# Altium PCB MainBoardPCB_4.PcbDoc (part 10 of 32)
Units mm, origin at the board's own origin, x right, y up, seen from the top; angles counter-clockwise.
Board outline 333.63 x 349.38 mm, 16 copper layers (L1, L2 (GND), L3 (Sign), L4 (GND), L5 (Sign), L6 (PWR/GND), L7(PWR/GND), L8 (Plane_GND), L9 (PWR/GND), L10 (PWR/GND), L11 (PWR/GND), L12 (Sign), L13 (GND), L14 (Sign), L15 (GND), L16), stack 2.502 mm thick; 2205 components, 1648 nets, 8314 pads, 3172 vias.
Unrouted connection lines stored in the file: 5141.
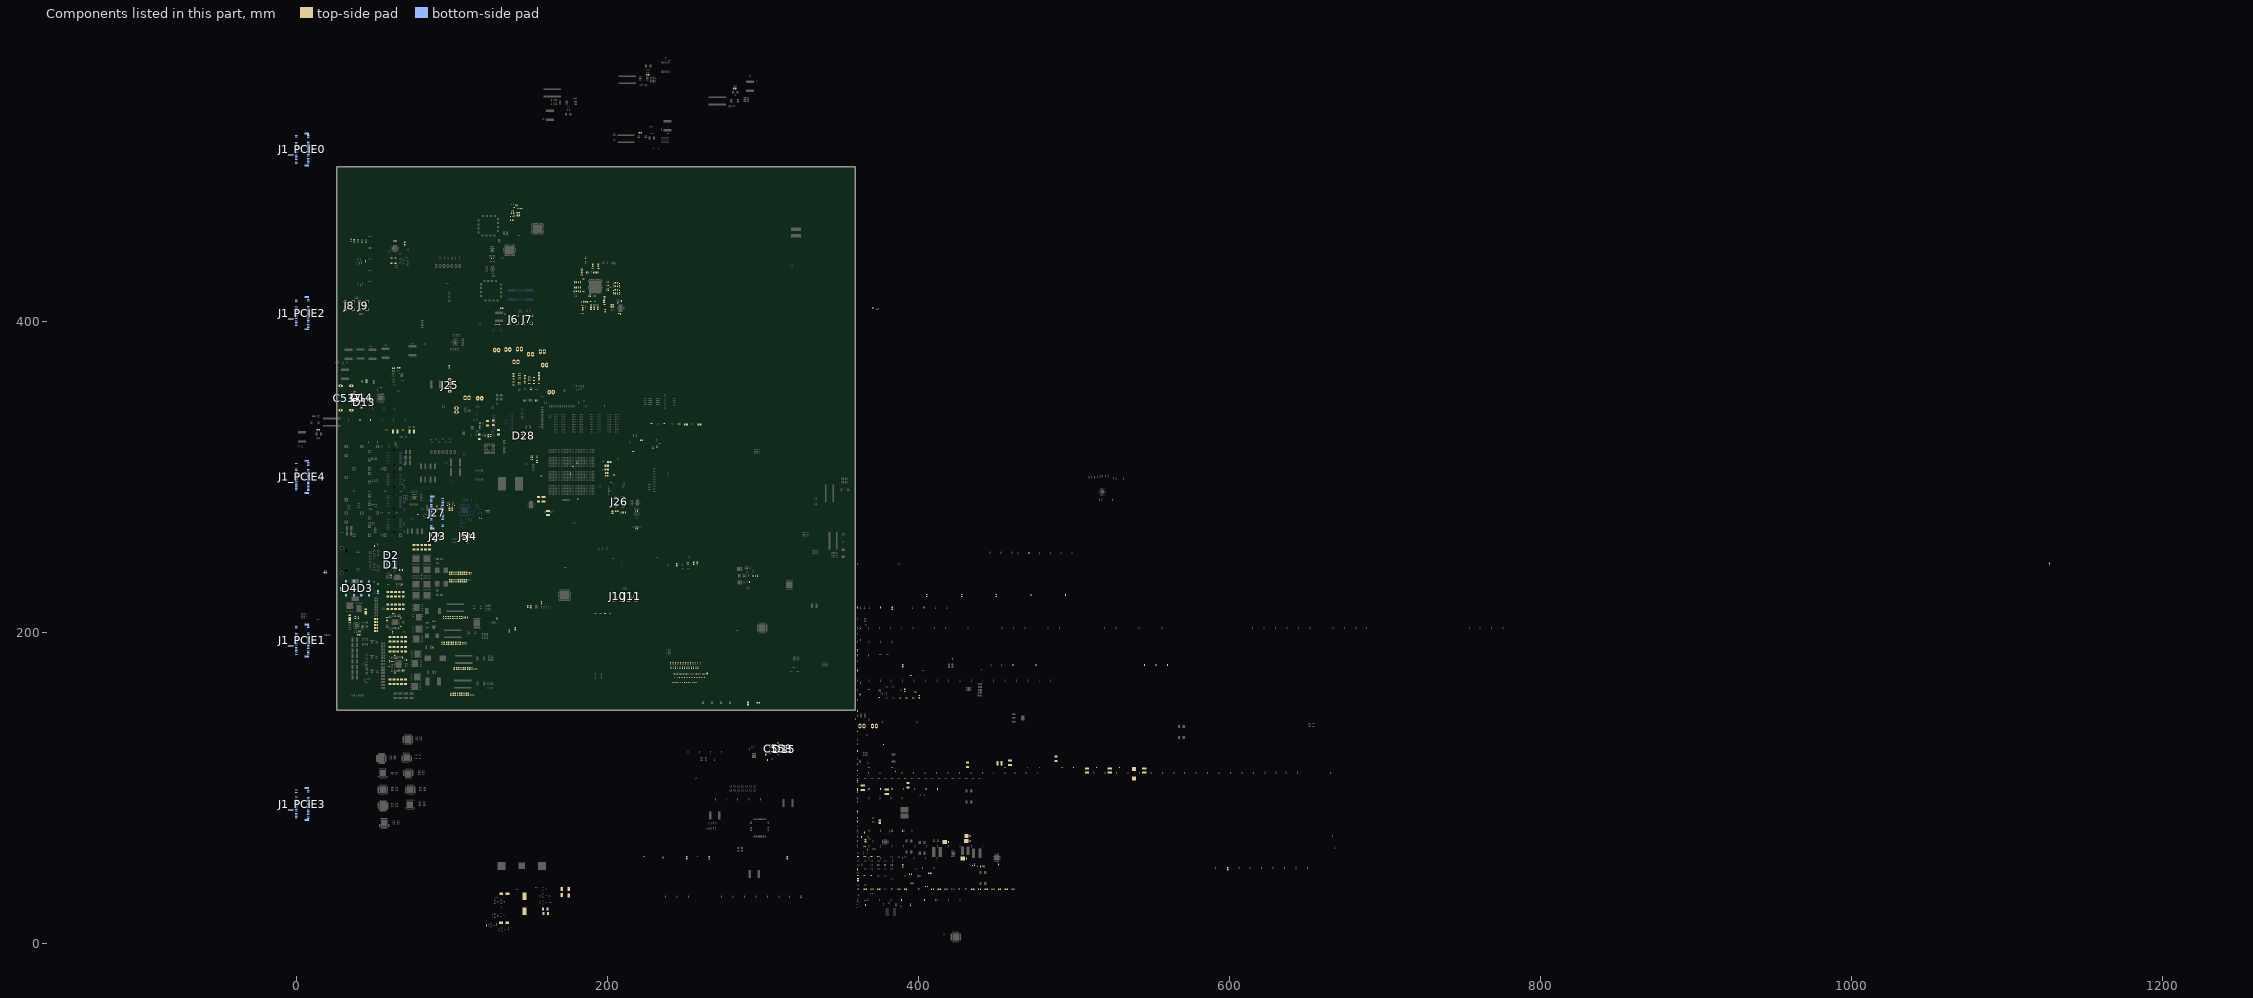
[diagram p19: the components of this part, seen from the top]

## Part data (continued)
C605 C616: library part Capacitor, Case/Package=0201, Case Code (Metric)=0603, Dielectric=C0G, Manufacturer=Murata, Manufacturer Part Number=GRM0335C1E101JA01D, Max Operating Temperature=125°C, Min Operating Temperature=-55°C, Package Quantity=15000, Supplier Part Number 1=490-3160-1-ND, Tolerance=5%, Voltage=25V, Capacitance=100pF, Case Code (Imperial)=0201, ComponentLink1Description=https://datasheet.ciiva.com/16497/grm0335c1e101ja01-01-16497112.pdf?src-supplier=Future+Electronics, ComponentLink1URL=https://datasheet.ciiva.com/16497/grm0335c1e101ja01-01-16497112.pdf?src-supplier=Future+Electronics, ComponentLink2Description=https://datasheet.ciiva.com/18697/product-18697797.pdf?src-supplier=Digi-Key, ComponentLink2URL=https://datasheet.ciiva.com/18697/product-18697797.pdf?src-supplier=Digi-Key, Depth=0.3mm, Height=0.3mm, Lead Free="Lead Free", Length=0.6mm, Mount="Surface Mount", Packaging="Tape and Reel", Pricing 1="1 = 0,10000, 10 = 0,01300, 100 = 0,00560, 500 = 0,00400, 1000 = 0,00315, 2500 = 0,00286, 5000 = 0,00263 (USD)", Radiation Hardening=No, REACH SVHC="No SVHC", RoHS=Yes, Stock 1=1884783, Supplier 1=Digi-Key, Termination=SMD/SMT, Thickness=0.013inch, Voltage Rating=25V, Voltage Rating (DC)=25V, Width=0.012inch
C609: "Supercapacitors / Ultracapacitors 0.22F 5.5volts SMD Super Capacitor", Capacitance=220mF, Case/Package=Radial, ESR (Equivalent Series Resistance)=25R, Leakage Current=330uA, Manufacturer=KEMET, Max Operating Temperature=70°C, Min Operating Temperature=-25°C, Package Quantity=500, Supplier Part Number 1=18X4838, Tolerance=80%, Voltage=5.5V, Category=Capacitors, ComponentLink1Description=https://datasheet.ciiva.com/29533/docfinderpartnumber-fc0h224zftbr24-29533957.pdf?src-supplier=Digi-Key, ComponentLink1URL=https://datasheet.ciiva.com/29533/docfinderpartnumber-fc0h224zftbr24-29533957.pdf?src-supplier=Digi-Key, ComponentLink2Description=https://datasheet.ciiva.com/46644/70368307-46644566.pdf?src-supplier=Allied+Electronics, ComponentLink2URL=https://datasheet.ciiva.com/46644/70368307-46644566.pdf?src-supplier=Allied+Electronics, ComponentLink3Description=https://datasheet.ciiva.com/28448/1754672-28448906.pdf?src-supplier=Element14, ComponentLink3URL=https://datasheet.ciiva.com/28448/1754672-28448906.pdf?src-supplier=Element14, ComponentLink4Description=https://datasheet.ciiva.com/29984/kem-s6011-fc-29984986.pdf?src-supplier=Avnet, ComponentLink4URL=https://datasheet.ciiva.com/29984/kem-s6011-fc-29984986.pdf?src-supplier=Avnet, Depth=8.5mm, Diameter=10.5mm, Height=8.5mm, Height - Seated (Max)=0.335inch, Lead Pitch=5mm, Length=10.8mm, Manufacturer Part Number=FC0H224ZFTBR24, Mount="Surface Mount", Packaging="Tape and Reel", Radiation Hardening=No, REACH SVHC="No SVHC", RoHS=Yes, Supplier 1=Newark, Termination=SMD/SMT, Voltage Rating=5.5V, Voltage Rating (DC)=5.5V, Width=10.8mm
C624 C625 C626: library part Capacitor, Case/Package=0201, Case Code (Metric)=0603, Dielectric=X5R, Manufacturer=Yageo, Manufacturer Part Number=CC0201KRX5R7BB103, Max Operating Temperature=85°C, Min Operating Temperature=-55°C, Supplier Part Number 1=311-1596-1-ND, Tolerance=10%, Voltage Rating=16V, Capacitance=10nF, Case Code (Imperial)=0201, ComponentLink1Description=http://components.arrow.com/part/dataview/0323_04166367?src-supplier=Arrow+Europe, ComponentLink1URL=http://components.arrow.com/part/dataview/0323_04166367?src-supplier=Arrow+Europe, ComponentLink2Description=http://www.mouser.com/ds/2/447/UPY-GPHC_X5R_4V-to-50V_25-1131599.pdf?src-supplier=Mouser, ComponentLink2URL=http://www.mouser.com/ds/2/447/UPY-GPHC_X5R_4V-to-50V_25-1131599.pdf?src-supplier=Mouser, ComponentLink3Description=http://www.yageo.com/documents/recent/UPY-GPHC_X5R_4V-to-50V_25.pdf?src-supplier=Digi-Key, ComponentLink3URL=http://www.yageo.com/documents/recent/UPY-GPHC_X5R_4V-to-50V_25.pdf?src-supplier=Digi-Key, Composition=Ceramic, Depth=0.3mm, Halogen Free="Halogen Free", Lead Free="Lead Free", Length=0.024inch, Mount="Surface Mount", Packaging="Tape and Reel", Pricing 1="1 = 0,10000, 10 = 0,01800, 100 = 0,00810, 500 = 0,00582, 1000 = 0,00457, 2500 = 0,00415, 5000 = 0,00382 (USD)", RoHS=Yes, Stock 1=521889, Supplier 1=Digi-Key, Termination=SMD/SMT, Thickness=0.013inch, Voltage Rating (DC)=16V, Weight=6E-06oz, Width=0.012inch
C627: library part Capacitor, "CAP CER 0.1UF 16V X5R 0201", Case/Package=0201, Case Code (Metric)=0603, Dielectric=X5R, Manufacturer=Murata, Manufacturer Part Number=GRM033R61C104ME84D, Max Operating Temperature=85°C, Min Operating Temperature=-55°C, Package Quantity=15000, Supplier Part Number 1=490-9986-1-ND, Tolerance=20%, Voltage Rating=16V, Capacitance=100nF, Case Code (Imperial)=0201, Category="Ceramic Capacitors", ComponentLink1Description=http://www.mouser.com/ds/2/281/c02e-2905.pdf?src-supplier=Mouser, ComponentLink1URL=http://www.mouser.com/ds/2/281/c02e-2905.pdf?src-supplier=Mouser, ComponentLink2Description=http://search.murata.co.jp/Ceramy/image/img/A01X/G101/ENG/GRM033R61C104ME84-01.pdf?src-supplier=Digi-Key, ComponentLink2URL=http://search.murata.co.jp/Ceramy/image/img/A01X/G101/ENG/GRM033R61C104ME84-01.pdf?src-supplier=Digi-Key, Height=0.3mm, Length=0.024inch, Mount="Surface Mount", Packaging="Tape and Reel", Pricing 1="1=0,10000, 10=0,06000, 100=0,02670, 500=0,01906, 1000=0,01497, 2500=0,01361, 5000=0,01252 (USD)", RoHS=Yes, Stock 1=519119, Supplier 1=Digi-Key, Termination=SMD/SMT, Thickness=0.013inch, Voltage Rating (DC)=16V, Weight=1.2E-05oz, Width=0.3mm
C628: library part Capacitor, "Multilayer Ceramic Capacitors MLCC - SMD/SMT 470nF 6.3V X5R 10%", Case/Package=0402, Case Code (Metric)=1005, Dielectric=X5R, Manufacturer=Yageo, Manufacturer Part Number=CC0402KRX5R5BB474, Max Operating Temperature=85°C, Min Operating Temperature=-55°C, Supplier Part Number 1=311-1684-1-ND, Tolerance=10%, Voltage Rating=6.3V, Capacitance=470nF, Case Code (Imperial)=0402, Category="Ceramic Capacitors", ComponentLink1Description=http://components.arrow.com/part/dataview/0323_00776134?src-supplier=Arrow+Europe, ComponentLink1URL=http://components.arrow.com/part/dataview/0323_00776134?src-supplier=Arrow+Europe, ComponentLink2Description=http://www.mouser.com/ds/2/447/UPY-GPHC_X5R_4V-to-50V_25-1131599.pdf?src-supplier=Mouser, ComponentLink2URL=http://www.mouser.com/ds/2/447/UPY-GPHC_X5R_4V-to-50V_25-1131599.pdf?src-supplier=Mouser, ComponentLink3Description=http://www.yageo.com/documents/recent/UPY-GPHC_X5R_4V-to-50V-16.pdf?src-supplier=Future+Electronics, ComponentLink3URL=http://www.yageo.com/documents/recent/UPY-GPHC_X5R_4V-to-50V-16.pdf?src-supplier=Future+Electronics, ComponentLink4Description=http://www.yageo.com/documents/recent/UPY-GPHC_X5R_4V-to-50V_12.pdf?src-supplier=Avnet, ComponentLink4URL=http://www.yageo.com/documents/recent/UPY-GPHC_X5R_4V-to-50V_12.pdf?src-supplier=Avnet, ComponentLink5Description=http://www.yageo.com/documents/recent/UPY-GPHC_X5R_4V-to-50V_10.pdf?src-supplier=Avnet+Europe, ComponentLink5URL=http://www.yageo.com/documents/recent/UPY-GPHC_X5R_4V-to-50V_10.pdf?src-supplier=Avnet+Europe, ComponentLink6Description=http://www.yageo.com/exep/pages/download/literatures/ProductSelectionGuide%202014_Final_2.pdf?src-supplier=Digi-Key, ComponentLink6URL=http://www.yageo.com/exep/pages/download/literatures/ProductSelectionGuide%202014_Final_2.pdf?src-supplier=Digi-Key, ComponentLink7Description=http://www.yageo.com/documents/recent/UPY-GPHC_X5R_4V-to-50V_25.pdf?src-supplier=Digi-Key, ComponentLink7URL=http://www.yageo.com/documents/recent/UPY-GPHC_X5R_4V-to-50V_25.pdf?src-supplier=Digi-Key, ComponentLink8Description=https://www.verical.com/server-webapp/html/getDatasheet?partID=376669&src-supplier=Verical, ComponentLink8URL=https://www.verical.com/server-webapp/html/getDatasheet?partID=376669&src-supplier=Verical, Composition=Ceramic, Depth=0.5mm, Halogen Free="Halogen Free", Height=0.5mm, Lead Free="Lead Free", Length=1mm, Mount="Surface Mount", Number of Pins=2, Packaging="Tape and Reel", Pricing 1="1=0,10000, 10=0,07000, 100=0,03130, 500=0,02236, 1000=0,01758, 2500=0,01598, 5000=0,01470 (USD)", Radiation Hardening=No, RoHS=Yes, Stock 1=102175, Supplier 1=Digi-Key, Termination=SMD/SMT, Thickness=0.022inch, Voltage Rating (DC)=6.3V, Weight=2.3E-05oz, Width=0.02inch
C630 C632: library part Capacitor, "Multilayer Ceramic Capacitors MLCC - SMD/SMT 470nF 6.3V X5R 10%", Case Code (Imperial)=0402, Case Code (Metric)=1005, Dielectric=X5R, Manufacturer=Yageo, Manufacturer Part Number=CC0402KRX5R5BB474, Max Operating Temperature=85°C, Min Operating Temperature=-55°C, Supplier Part Number 1=311-1684-1-ND, Tolerance=10%, Voltage Rating=6.3V, Capacitance=470nF, Case/Package=0402, Category="Ceramic Capacitors", ComponentLink1Description=http://components.arrow.com/part/dataview/0323_00776134?src-supplier=Arrow+Europe, ComponentLink1URL=http://components.arrow.com/part/dataview/0323_00776134?src-supplier=Arrow+Europe, ComponentLink2Description=http://www.mouser.com/ds/2/447/UPY-GPHC_X5R_4V-to-50V_25-1131599.pdf?src-supplier=Mouser, ComponentLink2URL=http://www.mouser.com/ds/2/447/UPY-GPHC_X5R_4V-to-50V_25-1131599.pdf?src-supplier=Mouser, ComponentLink3Description=http://www.yageo.com/documents/recent/UPY-GPHC_X5R_4V-to-50V-16.pdf?src-supplier=Future+Electronics, ComponentLink3URL=http://www.yageo.com/documents/recent/UPY-GPHC_X5R_4V-to-50V-16.pdf?src-supplier=Future+Electronics, ComponentLink4Description=http://www.yageo.com/documents/recent/UPY-GPHC_X5R_4V-to-50V_12.pdf?src-supplier=Avnet, ComponentLink4URL=http://www.yageo.com/documents/recent/UPY-GPHC_X5R_4V-to-50V_12.pdf?src-supplier=Avnet, ComponentLink5Description=http://www.yageo.com/documents/recent/UPY-GPHC_X5R_4V-to-50V_10.pdf?src-supplier=Avnet+Europe, ComponentLink5URL=http://www.yageo.com/documents/recent/UPY-GPHC_X5R_4V-to-50V_10.pdf?src-supplier=Avnet+Europe, ComponentLink6Description=http://www.yageo.com/exep/pages/download/literatures/ProductSelectionGuide%202014_Final_2.pdf?src-supplier=Digi-Key, ComponentLink6URL=http://www.yageo.com/exep/pages/download/literatures/ProductSelectionGuide%202014_Final_2.pdf?src-supplier=Digi-Key, ComponentLink7Description=http://www.yageo.com/documents/recent/UPY-GPHC_X5R_4V-to-50V_25.pdf?src-supplier=Digi-Key, ComponentLink7URL=http://www.yageo.com/documents/recent/UPY-GPHC_X5R_4V-to-50V_25.pdf?src-supplier=Digi-Key, ComponentLink8Description=https://www.verical.com/server-webapp/html/getDatasheet?partID=376669&src-supplier=Verical, ComponentLink8URL=https://www.verical.com/server-webapp/html/getDatasheet?partID=376669&src-supplier=Verical, Composition=Ceramic, Depth=0.5mm, Halogen Free="Halogen Free", Height=0.5mm, Lead Free="Lead Free", Length=1mm, Mount="Surface Mount", Number of Pins=2, Packaging="Tape and Reel", Pricing 1="1=0,10000, 10=0,07000, 100=0,03130, 500=0,02236, 1000=0,01758, 2500=0,01598, 5000=0,01470 (USD)", Radiation Hardening=No, RoHS=Yes, Stock 1=102175, Supplier 1=Digi-Key, Termination=SMD/SMT, Thickness=0.022inch, Voltage Rating (DC)=6.3V, Weight=2.3E-05oz, Width=0.02inch
C633 C636: library part Capacitor, Case/Package=0402, Case Code (Metric)=1005, Dielectric=U2J, Manufacturer=Murata, Manufacturer Part Number=GRM1557U1A302JA01D, Max Operating Temperature=125°C, Min Operating Temperature=-55°C, Package Quantity=10000, Supplier Part Number 1=490-8243-1-ND, Tolerance=5%, Voltage Rating=10V, Capacitance=3nF, Case Code (Imperial)=0402, ComponentLink1Description=https://datasheet.ciiva.com/11620/product-11620441.pdf?src-supplier=Avnet, ComponentLink1URL=https://datasheet.ciiva.com/11620/product-11620441.pdf?src-supplier=Avnet, ComponentLink2Description=https://datasheet.ciiva.com/29542/partnumbering-e-01-29542685.pdf?src-supplier=Digi-Key, ComponentLink2URL=https://datasheet.ciiva.com/29542/partnumbering-e-01-29542685.pdf?src-supplier=Digi-Key, ComponentLink3Description=https://datasheet.ciiva.com/29542/partnumbering-e-01-29542686.pdf?src-supplier=Digi-Key, ComponentLink3URL=https://datasheet.ciiva.com/29542/partnumbering-e-01-29542686.pdf?src-supplier=Digi-Key, ComponentLink4Description=https://datasheet.ciiva.com/29542/partnumbering-e-01-29542687.pdf?src-supplier=Digi-Key, ComponentLink4URL=https://datasheet.ciiva.com/29542/partnumbering-e-01-29542687.pdf?src-supplier=Digi-Key, Depth=0.5mm, Height=0.5mm, Lead Free="Lead Free", Length=1mm, Mount="Surface Mount", Packaging="Tape and Reel", Pricing 1="1 = 0,22000, 10 = 0,14700, 100 = 0,07450, 500 = 0,05100, 1000 = 0,04511, 2500 = 0,04315, 5000 = 0,03923 (USD)", Radiation Hardening=No, RoHS=Yes, Stock 1=13189, Supplier 1=Digi-Key, Termination=SMD/SMT, Thickness=0.022inch, Voltage Rating (DC)=10V, Width=0.5mm
C634: library part Capacitor, Case/Package=0402, Case Code (Metric)=1005, Dielectric=X7R, Dielectric Material=Ceramic, Insulation Resistance=100GR, Manufacturer=Yageo, Manufacturer Part Number=CC0402KRX7R9BB331, Max Operating Temperature=125°C, Min Operating Temperature=-55°C, Package Quantity=1, Supplier Part Number 1=311-1027-1-ND, Tolerance=10%, Voltage Rating=50V, Capacitance=330pF, Case Code (Imperial)=0402, ComponentLink1Description=https://datasheet.ciiva.com/143/mlccorderingcode-143965.pdf?src-supplier=Digi-Key, ComponentLink1URL=https://datasheet.ciiva.com/143/mlccorderingcode-143965.pdf?src-supplier=Digi-Key, ComponentLink2Description=https://datasheet.ciiva.com/143/mlccorderingcode-143966.pdf?src-supplier=Digi-Key, ComponentLink2URL=https://datasheet.ciiva.com/143/mlccorderingcode-143966.pdf?src-supplier=Digi-Key, ComponentLink3Description=https://datasheet.ciiva.com/143/mlccorderingcode-143967.pdf?src-supplier=Digi-Key, ComponentLink3URL=https://datasheet.ciiva.com/143/mlccorderingcode-143967.pdf?src-supplier=Digi-Key, ComponentLink4Description=https://datasheet.ciiva.com/7978/1489800-7978101.pdf?src-supplier=Element14, ComponentLink4URL=https://datasheet.ciiva.com/7978/1489800-7978101.pdf?src-supplier=Element14, ComponentLink5Description=https://datasheet.ciiva.com/5425/upy-gphc-x7r-6-3v-to-50v-8-5425451.pdf?src-supplier=Mouser, ComponentLink5URL=https://datasheet.ciiva.com/5425/upy-gphc-x7r-6-3v-to-50v-8-5425451.pdf?src-supplier=Mouser, ComponentLink6Description=https://datasheet.ciiva.com/8033/1489800-8033628.pdf?src-supplier=Element14, ComponentLink6URL=https://datasheet.ciiva.com/8033/1489800-8033628.pdf?src-supplier=Element14, ComponentLink7Description=https://datasheet.ciiva.com/11464/upy-gphc-x7r-6-3v-to-50v-8-11464908.pdf?src-supplier=Avnet, ComponentLink7URL=https://datasheet.ciiva.com/11464/upy-gphc-x7r-6-3v-to-50v-8-11464908.pdf?src-supplier=Avnet, ComponentLink8Description=https://datasheet.ciiva.com/46394/1489800-46394572.pdf?src-supplier=Element14, ComponentLink8URL=https://datasheet.ciiva.com/46394/1489800-46394572.pdf?src-supplier=Element14, ComponentLink9Description=https://datasheet.ciiva.com/8033/1489800-8033629.pdf?src-supplier=Element14, ComponentLink9URL=https://datasheet.ciiva.com/8033/1489800-8033629.pdf?src-supplier=Element14, Composition=Ceramic, Depth=0.5mm, Halogen Free="Halogen Free", Height=0.5mm, Lead Free="Lead Free", Length=1mm, Mount="Surface Mount", Packaging="Tape and Reel", Pricing 1="1 = 0,10000, 10 = 0,03000, 100 = 0,01350, 500 = 0,00966, 1000 = 0,00759, 2500 = 0,00690, 5000 = 0,00635 (USD)", Radiation Hardening=No, REACH SVHC="No SVHC", RoHS=Yes, Stock 1=223776, Supplier 1=Digi-Key, Termination=SMD/SMT, Thickness=0.022inch, Voltage Rating (DC)=50V, Width=0.5mm
C635: library part Capacitor, Case/Package=0402, Case Code (Metric)=1005, Dielectric=X7R, Manufacturer=Yageo, Manufacturer Part Number=CC0402KRX7R9BB682, Max Operating Temperature=125°C, Min Operating Temperature=-55°C, Supplier Part Number 1=311-1726-1-ND, Tolerance=10%, Voltage=50V, Capacitance=6.8nF, Case Code (Imperial)=0402, ComponentLink1Description=https://datasheet.ciiva.com/11786/0900766b8079c870-11786013.pdf?src-supplier=RSComponents, ComponentLink1URL=https://datasheet.ciiva.com/11786/0900766b8079c870-11786013.pdf?src-supplier=RSComponents, ComponentLink2Description=https://datasheet.ciiva.com/17437/upy-gphc-x7r-6-3v-to-50v-8-17437372.pdf?src-supplier=Avnet+Europe, ComponentLink2URL=https://datasheet.ciiva.com/17437/upy-gphc-x7r-6-3v-to-50v-8-17437372.pdf?src-supplier=Avnet+Europe, ComponentLink3Description=https://datasheet.ciiva.com/11466/upy-gphc-x7r-6-3v-to-50v-8-11466414.pdf?src-supplier=Avnet, ComponentLink3URL=https://datasheet.ciiva.com/11466/upy-gphc-x7r-6-3v-to-50v-8-11466414.pdf?src-supplier=Avnet, ComponentLink4Description=https://datasheet.ciiva.com/13208/upy-gphc-x7r-6-3v-to-50v-8-12304-13208543.pdf?src-supplier=Mouser, ComponentLink4URL=https://datasheet.ciiva.com/13208/upy-gphc-x7r-6-3v-to-50v-8-12304-13208543.pdf?src-supplier=Mouser, Composition=Ceramic, Depth=0.5mm, Halogen Free="Halogen Free", Height=0.5mm, Lead Free="Lead Free", Length=1mm, Mount="Surface Mount", Number of Pins=2, Packaging="Tape and Reel", Pricing 1="1 = 0,10000, 10 = 0,03000, 100 = 0,01350, 500 = 0,00966, 1000 = 0,00759, 2500 = 0,00690, 5000 = 0,00635 (USD)", Radiation Hardening=No, RoHS=Yes, Stock 1=116423, Supplier 1=Digi-Key, Termination=SMD/SMT, Thickness=0.022inch, Voltage Rating=50V, Voltage Rating (DC)=50V, Weight=2.3E-05oz, Width=0.02inch
C637 C638 C645 C646: library part Capacitor, "CAP CER 1200PF 50V X7R 0402", Case Code (Imperial)=0402, Case Code (Metric)=1005, Dielectric=X7R, Manufacturer=Yageo, Manufacturer Part Number=CC0402KRX7R9BB122, Max Operating Temperature=125°C, Min Operating Temperature=-55°C, Package Quantity=1, Supplier Part Number 1=311-1031-1-ND, Tolerance=10%, Voltage Rating=50V, Capacitance=1.2nF, Case/Package=0402, Category="Ceramic Capacitors", ComponentLink1Description=https://datasheet.ciiva.com/26862/getdatasheetpartid-403475-26862644.pdf?src-supplier=Verical, ComponentLink1URL=https://datasheet.ciiva.com/26862/getdatasheetpartid-403475-26862644.pdf?src-supplier=Verical, ComponentLink2Description=https://datasheet.ciiva.com/143/mlccorderingcode-143979.pdf?src-supplier=Digi-Key, ComponentLink2URL=https://datasheet.ciiva.com/143/mlccorderingcode-143979.pdf?src-supplier=Digi-Key, ComponentLink3Description=https://datasheet.ciiva.com/143/mlccorderingcode-143977.pdf?src-supplier=Digi-Key, ComponentLink3URL=https://datasheet.ciiva.com/143/mlccorderingcode-143977.pdf?src-supplier=Digi-Key, ComponentLink4Description=https://datasheet.ciiva.com/13209/upy-gphc-x7r-6-3v-to-50v-8-12304-13209337.pdf?src-supplier=Mouser, ComponentLink4URL=https://datasheet.ciiva.com/13209/upy-gphc-x7r-6-3v-to-50v-8-12304-13209337.pdf?src-supplier=Mouser, ComponentLink5Description=https://datasheet.ciiva.com/17437/upy-gphc-x7r-6-3v-to-50v-8-17437177.pdf?src-supplier=Avnet+Europe, ComponentLink5URL=https://datasheet.ciiva.com/17437/upy-gphc-x7r-6-3v-to-50v-8-17437177.pdf?src-supplier=Avnet+Europe, ComponentLink6Description=https://datasheet.ciiva.com/143/mlccorderingcode-143978.pdf?src-supplier=Digi-Key, ComponentLink6URL=https://datasheet.ciiva.com/143/mlccorderingcode-143978.pdf?src-supplier=Digi-Key, Composition=Ceramic, Depth=0.5mm, Halogen Free="Halogen Free", Height=0.5mm, Lead Free="Lead Free", Length=1mm, Mount="Surface Mount", Number of Pins=2, Packaging="Tape and Reel", Pricing 1="1=0,10000, 10=0,03100, 100=0,01370, 500=0,00982, 1000=0,00771, 2500=0,00701, 5000=0,00645 (USD)", Radiation Hardening=No, RoHS=Yes, Stock 1=202147, Supplier 1=Digi-Key, Termination=SMD/SMT, Thickness=0.022inch, Voltage Rating (DC)=50V, Weight=2.3E-05oz, Width=0.02inch
C639 C640 C647 C648: library part Capacitor, Case/Package=0402, Case Code (Metric)=1005, Dielectric=X7R, Insulation Resistance=10GR, Manufacturer=Yageo, Manufacturer Part Number=CC0402KRX7R8BB473, Max Operating Temperature=125°C, Min Operating Temperature=-55°C, Supplier Part Number 1=311-1717-1-ND, Tolerance=10%, Voltage Rating=25V, Capacitance=47nF, Case Code (Imperial)=0402, ComponentLink1Description=http://www.mouser.com/ds/2/447/Yageo_UPY-GP_NP0_16V-to-50V_9-358835.pdf?src-supplier=Mouser, ComponentLink1URL=http://www.mouser.com/ds/2/447/Yageo_UPY-GP_NP0_16V-to-50V_9-358835.pdf?src-supplier=Mouser, ComponentLink2Description=http://components.arrow.com/part/dataview/0323_02822063?src-supplier=Arrow+Europe, ComponentLink2URL=http://components.arrow.com/part/dataview/0323_02822063?src-supplier=Arrow+Europe, ComponentLink3Description=http://www.yageo.com/documents/recent/UPY-GPHC_X7R_6.3V-to-50V_18.pdf?src-supplier=Digi-Key, ComponentLink3URL=http://www.yageo.com/documents/recent/UPY-GPHC_X7R_6.3V-to-50V_18.pdf?src-supplier=Digi-Key, ComponentLink4Description=http://www.yageo.com/exep/pages/download/literatures/ProductSelectionGuide%202014_Final_2.pdf?src-supplier=Digi-Key, ComponentLink4URL=http://www.yageo.com/exep/pages/download/literatures/ProductSelectionGuide%202014_Final_2.pdf?src-supplier=Digi-Key, ComponentLink5Description=http://www.yageo.com/documents/recent/UPY-GPHC_X7R_6.3V-to-50V_10.pdf?src-supplier=Future+Electronics, ComponentLink5URL=http://www.yageo.com/documents/recent/UPY-GPHC_X7R_6.3V-to-50V_10.pdf?src-supplier=Future+Electronics, Composition=Ceramic, Depth=0.5mm, Dissipation Factor=3.5%, Halogen Free="Halogen Free", Lead Free="Lead Free", Length=0.039inch, Mount="Surface Mount", Packaging="Tape and Reel", Pricing 1="1 = 0,10000, 10 = 0,03800, 100 = 0,01710, 500 = 0,01224, 1000 = 0,00962, 2500 = 0,00874, 5000 = 0,00805 (USD)", RoHS=Yes, Stock 1=136338, Supplier 1=Digi-Key, Termination=SMD/SMT, Thickness=0.022inch, Voltage Rating (DC)=25V, Weight=2.3E-05oz, Width=0.02inch
C641: library part Capacitor, Case/Package=0402, Dielectric=X7R, Dielectric Material=Ceramic, Manufacturer=KEMET, Manufacturer Part Number=C0402C471K5RACTU, Max Operating Temperature=125°C, Min Operating Temperature=-55°C, Supplier Part Number 1=399-1025-1-ND, Tolerance=10%, Voltage=50V, Capacitance=470pF, ComponentLink1Description=https://datasheet.ciiva.com/7747/kem-c1002-x7r-smd-7747647.pdf?src-supplier=Element14, ComponentLink1URL=https://datasheet.ciiva.com/7747/kem-c1002-x7r-smd-7747647.pdf?src-supplier=Element14, ComponentLink2Description=https://datasheet.ciiva.com/6126/kem-c1002-x7r-smd-6126681.pdf?src-supplier=Farnell, ComponentLink2URL=https://datasheet.ciiva.com/6126/kem-c1002-x7r-smd-6126681.pdf?src-supplier=Farnell, Contact Plating=Tin,Matte, Depth=0.5mm, Height=0.5mm, Length=1mm, Mount="Surface Mount", Packaging="Tape and Reel", Pricing 1="1 = 0,10000, 10 = 0,03300, 100 = 0,01490, 500 = 0,01062, 1000 = 0,00835, 2500 = 0,00759, 5000 = 0,00698 (USD)", Radiation Hardening=No, RoHS=Yes, Stock 1=1606299, Supplier 1=Digi-Key, Termination=SMD/SMT, Voltage Rating (DC)=50V
C642: library part Capacitor, Case/Package=0402, Case Code (Metric)=1005, Dielectric=C0G, Manufacturer=Yageo, Manufacturer Part Number=CC0402JRNPO9BN560, Max Operating Temperature=125°C, Min Operating Temperature=-55°C, Package Quantity=1, Supplier Part Number 1=311-1022-1-ND, Tolerance=5%, Voltage Rating=50V, Capacitance=56pF, Case Code (Imperial)=0402, ComponentLink1Description=https://datasheet.ciiva.com/144/mlccorderingcode-144004.pdf?src-supplier=Digi-Key, ComponentLink1URL=https://datasheet.ciiva.com/144/mlccorderingcode-144004.pdf?src-supplier=Digi-Key, ComponentLink2Description=https://datasheet.ciiva.com/144/mlccorderingcode-144005.pdf?src-supplier=Digi-Key, ComponentLink2URL=https://datasheet.ciiva.com/144/mlccorderingcode-144005.pdf?src-supplier=Digi-Key, ComponentLink3Description=https://datasheet.ciiva.com/11587/upy-gp-np0-16v-to-50v-8-11587093.pdf?src-supplier=Avnet, ComponentLink3URL=https://datasheet.ciiva.com/11587/upy-gp-np0-16v-to-50v-8-11587093.pdf?src-supplier=Avnet, ComponentLink4Description=https://datasheet.ciiva.com/144/mlccorderingcode-144006.pdf?src-supplier=Digi-Key, ComponentLink4URL=https://datasheet.ciiva.com/144/mlccorderingcode-144006.pdf?src-supplier=Digi-Key, ComponentLink5Description=https://datasheet.ciiva.com/13208/upy-gp-np0-16v-to-50v-8-13208374.pdf?src-supplier=Mouser, ComponentLink5URL=https://datasheet.ciiva.com/13208/upy-gp-np0-16v-to-50v-8-13208374.pdf?src-supplier=Mouser, ComponentLink6Description=https://datasheet.ciiva.com/26862/getdatasheetpartid-403455-26862602.pdf?src-supplier=Verical, ComponentLink6URL=https://datasheet.ciiva.com/26862/getdatasheetpartid-403455-26862602.pdf?src-supplier=Verical, ComponentLink7Description=https://datasheet.ciiva.com/28450/1443161-28450271.pdf?src-supplier=Element14, ComponentLink7URL=https://datasheet.ciiva.com/28450/1443161-28450271.pdf?src-supplier=Element14, Composition=Ceramic, Depth=0.5mm, Height=0.5mm, Lead Free="Lead Free", Length=1mm, Mount="Surface Mount", Number of Pins=2, Packaging="Tape and Reel", Pricing 1="1 = 0,10000, 10 = 0,02300, 100 = 0,01030, 500 = 0,00736, 1000 = 0,00578, 2500 = 0,00525, 5000 = 0,00483 (USD)", Radiation Hardening=No, REACH SVHC="No SVHC", RoHS=Yes, Stock 1=531196, Supplier 1=Digi-Key, Termination=SMD/SMT, Thickness=0.022inch, Voltage Rating (DC)=50V, Weight=2.3E-05oz, Width=0.02inch
C643: library part Capacitor, Case/Package=0402, Case Code (Metric)=1005, Dielectric=X7R, Manufacturer=Yageo, Manufacturer Part Number=CC0402KRX7R7BB822, Max Operating Temperature=125°C, Min Operating Temperature=-55°C, Package Quantity=1, Supplier Part Number 1=311-1041-1-ND, Tolerance=10%, Voltage Rating=16V, Capacitance=8.2nF, Case Code (Imperial)=0402, ComponentLink1Description=https://datasheet.ciiva.com/26862/getdatasheetpartid-407631-26862637.pdf?src-supplier=Verical, ComponentLink1URL=https://datasheet.ciiva.com/26862/getdatasheetpartid-407631-26862637.pdf?src-supplier=Verical, ComponentLink2Description=https://datasheet.ciiva.com/155/mlccorderingcode-155857.pdf?src-supplier=Digi-Key, ComponentLink2URL=https://datasheet.ciiva.com/155/mlccorderingcode-155857.pdf?src-supplier=Digi-Key, ComponentLink3Description=https://datasheet.ciiva.com/17437/upy-gphc-x7r-6-3v-to-50v-8-17437354.pdf?src-supplier=Avnet+Europe, ComponentLink3URL=https://datasheet.ciiva.com/17437/upy-gphc-x7r-6-3v-to-50v-8-17437354.pdf?src-supplier=Avnet+Europe, ComponentLink4Description=https://datasheet.ciiva.com/11464/upy-gphc-x7r-6-3v-to-50v-8-11464887.pdf?src-supplier=Avnet, ComponentLink4URL=https://datasheet.ciiva.com/11464/upy-gphc-x7r-6-3v-to-50v-8-11464887.pdf?src-supplier=Avnet, ComponentLink5Description=https://datasheet.ciiva.com/155/mlccorderingcode-155858.pdf?src-supplier=Digi-Key, ComponentLink5URL=https://datasheet.ciiva.com/155/mlccorderingcode-155858.pdf?src-supplier=Digi-Key, ComponentLink6Description=https://datasheet.ciiva.com/155/mlccorderingcode-155859.pdf?src-supplier=Digi-Key, ComponentLink6URL=https://datasheet.ciiva.com/155/mlccorderingcode-155859.pdf?src-supplier=Digi-Key, Depth=0.5mm, Halogen Free="Halogen Free", Height=0.5mm, Lead Free="Lead Free", Length=1mm, Mount="Surface Mount", Packaging="Tape and Reel", Pricing 1="1 = 0,10000, 10 = 0,02500, 100 = 0,01090, 500 = 0,00782, 1000 = 0,00614, 2500 = 0,00558, 5000 = 0,00514 (USD)", Radiation Hardening=No, RoHS=Yes, Stock 1=137774, Supplier 1=Digi-Key, Termination=SMD/SMT, Thickness=0.022inch, Voltage Rating (DC)=16V, Width=0.02inch
C644: library part Capacitor, Case/Package=0402, Case Code (Metric)=1005, Dielectric=X7R, Manufacturer=Yageo, Manufacturer Part Number=CC0402KRX7R9BB821, Max Operating Temperature=125°C, Min Operating Temperature=-55°C, Package Quantity=10000, Supplier Part Number 1=311-1727-1-ND, Tolerance=10%, Voltage=50V, Capacitance=820pF, Case Code (Imperial)=0402, ComponentLink1Description=https://datasheet.ciiva.com/11786/0900766b80d84f1d-11786151.pdf?src-supplier=RSComponents, ComponentLink1URL=https://datasheet.ciiva.com/11786/0900766b80d84f1d-11786151.pdf?src-supplier=RSComponents, ComponentLink2Description=https://datasheet.ciiva.com/26862/getdatasheetpartid-495580-26862654.pdf?src-supplier=Verical, ComponentLink2URL=https://datasheet.ciiva.com/26862/getdatasheetpartid-495580-26862654.pdf?src-supplier=Verical, ComponentLink3Description=https://datasheet.ciiva.com/11587/upy-gphc-x7r-6-3v-to-50v-8-11587306.pdf?src-supplier=Avnet, ComponentLink3URL=https://datasheet.ciiva.com/11587/upy-gphc-x7r-6-3v-to-50v-8-11587306.pdf?src-supplier=Avnet, ComponentLink4Description=https://datasheet.ciiva.com/13210/upy-gphc-x7r-6-3v-to-50v-8-12304-13210429.pdf?src-supplier=Mouser, ComponentLink4URL=https://datasheet.ciiva.com/13210/upy-gphc-x7r-6-3v-to-50v-8-12304-13210429.pdf?src-supplier=Mouser, ComponentLink5Description=https://datasheet.ciiva.com/16623/upy-gphc-x7r-6-3v-to-50v-8-16623934.pdf?src-supplier=Avnet+Europe, ComponentLink5URL=https://datasheet.ciiva.com/16623/upy-gphc-x7r-6-3v-to-50v-8-16623934.pdf?src-supplier=Avnet+Europe, Composition=Ceramic, Depth=0.5mm, Halogen Free="Halogen Free", Height=0.5mm, Lead Free="Lead Free", Length=1mm, Mount="Surface Mount", Number of Pins=2, Packaging="Tape and Reel", Pricing 1="1 = 0,10000, 10 = 0,03600, 100 = 0,01620, 500 = 0,01156, 1000 = 0,00908, 2500 = 0,00825, 5000 = 0,00759 (USD)", Radiation Hardening=No, RoHS=Yes, Stock 1=31098, Supplier 1=Digi-Key, Termination=SMD/SMT, Thickness=0.022inch, Voltage Rating=50V, Voltage Rating (DC)=50V, Width=0.02inch
C650: library part Capacitor, Case/Package=0402, Case Code (Metric)=1005, Dielectric=C0G, Manufacturer=Yageo, Manufacturer Part Number=CC0402JRNPO9BN181, Max Operating Temperature=125°C, Min Operating Temperature=-55°C, Supplier Part Number 1=311-1663-1-ND, Tolerance=5%, Voltage Rating=50V, Capacitance=180pF, Case Code (Imperial)=0402, ComponentLink1Description=https://datasheet.ciiva.com/7656/1132289-7656613.pdf?src-supplier=Element14, ComponentLink1URL=https://datasheet.ciiva.com/7656/1132289-7656613.pdf?src-supplier=Element14, ComponentLink2Description=https://datasheet.ciiva.com/17434/upy-gp-np0-16v-to-50v-8-17434342.pdf?src-supplier=Avnet+Europe, ComponentLink2URL=https://datasheet.ciiva.com/17434/upy-gp-np0-16v-to-50v-8-17434342.pdf?src-supplier=Avnet+Europe, ComponentLink3Description=https://datasheet.ciiva.com/26829/getdatasheetpartid-316982-26829286.pdf?src-supplier=Verical, ComponentLink3URL=https://datasheet.ciiva.com/26829/getdatasheetpartid-316982-26829286.pdf?src-supplier=Verical, Composition=Ceramic, Depth=0.5mm, Lead Free="Lead Free", Length=1mm, Mount="Surface Mount", Number of Pins=2, Packaging="Tape and Reel", Pricing 1="1 = 0,10000, 10 = 0,05100, 100 = 0,02250, 500 = 0,01610, 1000 = 0,01264, 2500 = 0,01150, 5000 = 0,01058 (USD)", Radiation Hardening=No, REACH SVHC="No SVHC", RoHS=Yes, Stock 1=26996, Supplier 1=Digi-Key, Termination=SMD/SMT, Thickness=0.022inch, Voltage Rating (DC)=50V, Weight=2.3E-05oz, Width=0.5mm
C652: library part Capacitor, Case/Package=0402, Case Code (Metric)=1005, Dielectric=X7R, Manufacturer=Yageo, Manufacturer Part Number=CC0402KRX7R7BB222, Max Operating Temperature=125°C, Min Operating Temperature=-55°C, Package Quantity=10000, Supplier Part Number 1=311-1707-1-ND, Tolerance=10%, Voltage Rating=16V, Capacitance=2.2nF, Case Code (Imperial)=0402, ComponentLink1Description=https://datasheet.ciiva.com/17437/upy-gphc-x7r-6-3v-to-50v-8-17437341.pdf?src-supplier=Avnet+Europe, ComponentLink1URL=https://datasheet.ciiva.com/17437/upy-gphc-x7r-6-3v-to-50v-8-17437341.pdf?src-supplier=Avnet+Europe, ComponentLink2Description=https://datasheet.ciiva.com/11464/upy-gphc-x7r-6-3v-to-50v-8-11464879.pdf?src-supplier=Avnet, ComponentLink2URL=https://datasheet.ciiva.com/11464/upy-gphc-x7r-6-3v-to-50v-8-11464879.pdf?src-supplier=Avnet, Composition=Ceramic, Depth=0.5mm, Halogen Free="Halogen Free", Height=0.5mm, Lead Free="Lead Free", Length=1mm, Mount="Surface Mount", Number of Pins=2, Packaging="Tape and Reel", Pricing 1="1 = 0,10000, 10 = 0,03000, 100 = 0,01350, 500 = 0,00966, 1000 = 0,00759, 2500 = 0,00690, 5000 = 0,00635 (USD)", Radiation Hardening=No, RoHS=Yes, Stock 1=37205, Supplier 1=Digi-Key, Termination=SMD/SMT, Thickness=0.022inch, Voltage Rating (DC)=16V, Width=0.02inch
C655 C656 C657: library part Capacitor, Case/Package=0402, Case Code (Metric)=1005, Dielectric=X7R, Manufacturer=Yageo, Manufacturer Part Number=CC0402KRX7R8BB562, Max Operating Temperature=125°C, Min Operating Temperature=-55°C, Supplier Part Number 1=311-1718-1-ND, Tolerance=10%, Voltage Rating=25V, Capacitance=5.6nF, Case Code (Imperial)=0402, ComponentLink1Description=https://datasheet.ciiva.com/13264/upy-gphc-x7r-6-3v-to-50v-8-12304-13264955.pdf?src-supplier=Mouser, ComponentLink1URL=https://datasheet.ciiva.com/13264/upy-gphc-x7r-6-3v-to-50v-8-12304-13264955.pdf?src-supplier=Mouser, Composition=Ceramic, Depth=0.5mm, Halogen Free="Halogen Free", Lead Free="Lead Free", Length=0.039inch, Mount="Surface Mount", Number of Pins=2, Packaging="Tape and Reel", Pricing 1="1 = 0,10000, 10 = 0,03600, 100 = 0,01620, 500 = 0,01156, 1000 = 0,00908, 2500 = 0,00825, 5000 = 0,00759 (USD)", RoHS=Yes, Stock 1=37070, Supplier 1=Digi-Key, Termination=SMD/SMT, Thickness=0.022inch, Voltage Rating (DC)=25V, Weight=2.3E-05oz, Width=0.02inch
C663 C664: library part Capacitor, "KEMET - C0402C270J5GACTU - Multilayer Ceramic Capacitor, C Series, 27 pF, -  5%, C0G / NP0, 50 V, 0402 [1005 Metric] RoHS Compliant: Yes", Case/Package=0402, Case Code (Metric)=1005, Dielectric=C0G, Dielectric Material=Ceramic, Manufacturer=KEMET, Manufacturer Part Number=C0402C270J5GACTU, Max Operating Temperature=125°C, Min Operating Temperature=-55°C, Package Quantity=1, Supplier Part Number 1=399-1016-1-ND, Temperature Coefficient=30ppm/°C, Tolerance=5%, Voltage=50V, Capacitance=27pF, Case Code (Imperial)=0402, Category="Ceramic Capacitors", ComponentLink1Description=https://datasheet.ciiva.com/144/docfinderpartnumber-c0402c270j5gactu-144118.pdf?src-supplier=Digi-Key, ComponentLink1URL=https://datasheet.ciiva.com/144/docfinderpartnumber-c0402c270j5gactu-144118.pdf?src-supplier=Digi-Key, ComponentLink2Description=https://datasheet.ciiva.com/7747/kem-c1003-c0g-smd-7747509.pdf?src-supplier=Element14, ComponentLink2URL=https://datasheet.ciiva.com/7747/kem-c1003-c0g-smd-7747509.pdf?src-supplier=Element14, ComponentLink3Description=https://datasheet.ciiva.com/26847/getdatasheetpartid-408632-26847386.pdf?src-supplier=Verical, ComponentLink3URL=https://datasheet.ciiva.com/26847/getdatasheetpartid-408632-26847386.pdf?src-supplier=Verical, ComponentLink4Description=https://datasheet.ciiva.com/7392/1372242-7392237.pdf?src-supplier=Newark, ComponentLink4URL=https://datasheet.ciiva.com/7392/1372242-7392237.pdf?src-supplier=Newark, ComponentLink5Description=https://datasheet.ciiva.com/14586/70095383-14586671.pdf?src-supplier=Allied+Electronics, ComponentLink5URL=https://datasheet.ciiva.com/14586/70095383-14586671.pdf?src-supplier=Allied+Electronics, Contact Plating=Tin,Matte, Depth=0.5mm, Height=0.5mm, Lead Free="Lead Free", Length=1mm, Mount="Surface Mount,PCB", Number of Pins=2, Packaging="Tape and Reel", Pricing 1="1=0,10000, 10=0,03900, 100=0,01740, 500=0,01240, 1000=0,00974, 2500=0,00886, 5000=0,00815 (USD)", Radiation Hardening=No, REACH SVHC="No SVHC", RoHS=Yes, Stock 1=1753618, Supplier 1=Digi-Key, Termination=SMD/SMT, Thickness=0.022inch, Voltage Rating=50V, Voltage Rating (DC)=50V, Weight=2.3E-05oz, Width=0.5mm
C674 C675 C676 C782 C784 C786 C788: library part Capacitor, "0402 10 V 4.7 uF ±20% Tolerance X5R Multilayer Ceramic Chip Capacitor", Case/Package=0402, Case Code (Metric)=1005, Manufacturer=Murata, Manufacturer Part Number=GRM155R61A475MEAAD, Max Operating Temperature=85°C, Min Operating Temperature=-55°C, Supplier Part Number 1=490-14306-1-ND, Tolerance=20%, Voltage Rating=10V, Capacitance=4.7uF, Case Code (Imperial)=0402, Category="Ceramic Capacitors", ComponentLink1Description=http://www.farnell.com/datasheets/2189109.pdf?src-supplier=Farnell, ComponentLink1URL=http://www.farnell.com/datasheets/2189109.pdf?src-supplier=Farnell, ComponentLink2Description=https://search.murata.co.jp/Ceramy/image/img/A01X/G101/ENG/GRM155R61A475MEAA-01.pdf?src-supplier=Digi-Key, ComponentLink2URL=https://search.murata.co.jp/Ceramy/image/img/A01X/G101/ENG/GRM155R61A475MEAA-01.pdf?src-supplier=Digi-Key, ComponentLink3Description=http://datasheet.octopart.com/GRM155R61A475MEAAD-Murata-datasheet-68589269.pdf?src-supplier=Newark, ComponentLink3URL=http://datasheet.octopart.com/GRM155R61A475MEAAD-Murata-datasheet-68589269.pdf?src-supplier=Newark, ComponentLink4Description=http://datasheet.octopart.com/GRM155R61A475MEAAD-Murata-datasheet-8819587.pdf, ComponentLink4URL=http://datasheet.octopart.com/GRM155R61A475MEAAD-Murata-datasheet-8819587.pdf, ComponentLink5Description=http://datasheet.octopart.com/GRM155R61A475MEAAD-Murata-datasheet-10025737.pdf, ComponentLink5URL=http://datasheet.octopart.com/GRM155R61A475MEAAD-Murata-datasheet-10025737.pdf, ComponentLink6Description=http://datasheet.octopart.com/GRM155R61A475MEAAD-Murata-datasheet-11978611.pdf, ComponentLink6URL=http://datasheet.octopart.com/GRM155R61A475MEAAD-Murata-datasheet-11978611.pdf, ComponentLink7Description=http://datasheet.octopart.com/GRM155R61A475MEAAD-Murata-datasheet-12510076.pdf, ComponentLink7URL=http://datasheet.octopart.com/GRM155R61A475MEAAD-Murata-datasheet-12510076.pdf, ComponentLink8Description=http://datasheet.octopart.com/GRM155R61A475MEAAD-Murata-datasheet-12515295.pdf, ComponentLink8URL=http://datasheet.octopart.com/GRM155R61A475MEAAD-Murata-datasheet-12515295.pdf, Mount="Surface Mount", Packaging="Tape and Reel", Pricing 1="1=0,23000, 10=0,15400, 100=0,07780, 500=0,05322, 1000=0,04708, 2500=0,04504, 5000=0,04094 (USD)", Stock 1=980102, Supplier 1=Digi-Key
C678 C679: library part Capacitor, "Cap Ceramic 100uF 6.3V X6T 20% Pad SMD 1206 105C T/R", Case Code (Imperial)=1206, Case Code (Metric)=3216, Dielectric=X6T, Dielectric Material=Ceramic, Manufacturer=Murata, Manufacturer Part Number=GRM31CD80J107ME39L, Max Operating Temperature=105°C, Min Operating Temperature=-55°C, Package Quantity=2000, Supplier Part Number 1=490-10525-1-ND, Tolerance=20%, Voltage=6.3V, Capacitance=100uF, Case/Package=1206, Category="Ceramic Capacitors", ComponentLink1Description=https://datasheet.ciiva.com/7719/608985-7719130.pdf?src-supplier=Element14, ComponentLink1URL=https://datasheet.ciiva.com/7719/608985-7719130.pdf?src-supplier=Element14, Depth=1.6mm, Dissipation Factor=0.1%, Height=1.6mm, Lead Free="Lead Free", Length=3.2mm, Material=Ceramic, Mount="Surface Mount", Packaging="Tape and Reel", Pricing 1="1=0,76000, 10=0,56100, 100=0,38470, 500=0,30454, 1000=0,25645 (USD)", Radiation Hardening=No, REACH SVHC="No SVHC", RoHS=Yes, Stock 1=262558, Supplier 1=Digi-Key, Termination=SMD/SMT, Thickness=0.071inch, Voltage Rating=6.3V, Voltage Rating (DC)=6.3V, Weight=0.001411oz, Width=1.6mm
C693: library part Capacitor, "CAP CER 0.47UF 25V X5R 0402", Case/Package=0402, Case Code (Metric)=1005, Manufacturer=Murata, Manufacturer Part Number=GRT155R61E474KE01D, Max Operating Temperature=85°C, Min Operating Temperature=-55°C, Ratings=AEC-Q200, Supplier Part Number 1=490-12269-1-ND, Tolerance=10%, Voltage Rating=25V, Capacitance=470nF, Case Code (Imperial)=0402, Category="Ceramic Capacitors", ComponentLink1Description=http://search.murata.co.jp/Ceramy/image/img/A01X/G101/ENG/GRT155R61E474KE01-01.pdf?src-supplier=Digi-Key, ComponentLink1URL=http://search.murata.co.jp/Ceramy/image/img/A01X/G101/ENG/GRT155R61E474KE01-01.pdf?src-supplier=Digi-Key, Length=0.039inch, Mount="Surface Mount", Packaging="Tape and Reel", Pricing 1="1=0,12000, 10=0,08400, 100=0,03930, 500=0,02754, 1000=0,02280, 2500=0,02122, 5000=0,01941 (USD)", RoHS=Yes, Stock 1=188291, Supplier 1=Digi-Key, Thickness=0.022inch, Width=0.02inch
C694: library part Capacitor, "0603 4.7 uF 35 V ±10% Tolerance X5R Multilayer Ceramic Chip Capacitor", Case/Package=0603, Case Code (Metric)=1608, Dielectric=X5R, Manufacturer=Murata, Manufacturer Part Number=GRM188R6YA475KE15D, Max Operating Temperature=85°C, Min Operating Temperature=-55°C, Package Quantity=4000, Supplier Part Number 1=490-7205-6-ND, Tolerance=10%, Voltage=35V, Capacitance=4.7uF, Case Code (Imperial)=0603, Category="Ceramic Capacitors", ComponentLink1Description=https://datasheet.ciiva.com/46444/1769893-46444984.pdf?src-supplier=Element14, ComponentLink1URL=https://datasheet.ciiva.com/46444/1769893-46444984.pdf?src-supplier=Element14, ComponentLink2Description=https://datasheet.ciiva.com/46444/1769893-46444985.pdf?src-supplier=Element14, ComponentLink2URL=https://datasheet.ciiva.com/46444/1769893-46444985.pdf?src-supplier=Element14, ComponentLink3Description=https://datasheet.ciiva.com/14906/partnumbering-e-01-14906426.pdf?src-supplier=Digi-Key, ComponentLink3URL=https://datasheet.ciiva.com/14906/partnumbering-e-01-14906426.pdf?src-supplier=Digi-Key, ComponentLink4Description=https://datasheet.ciiva.com/14906/partnumbering-e-01-14906427.pdf?src-supplier=Digi-Key, ComponentLink4URL=https://datasheet.ciiva.com/14906/partnumbering-e-01-14906427.pdf?src-supplier=Digi-Key, ComponentLink5Description=https://datasheet.ciiva.com/14906/partnumbering-e-01-14906428.pdf?src-supplier=Digi-Key, ComponentLink5URL=https://datasheet.ciiva.com/14906/partnumbering-e-01-14906428.pdf?src-supplier=Digi-Key, Composition=Ceramic, Depth=0.8mm, Height=0.8mm, Lead Free="Lead Free", Length=1.6mm, Material=Ceramic, Mount="Surface Mount", Packaging="Tape and Reel", Pricing 1="1=0,50000, 10=0,34900, 100=0,20950, 500=0,15712, 1000=0,13267 (USD)", REACH SVHC="No SVHC", RoHS=Yes, Stock 1=211150, Supplier 1=Digi-Key, Termination=SMD/SMT, Thickness=0.031inch, Voltage Rating=35V, Voltage Rating (DC)=35V, Weight=0.000222oz, Width=0.8mm
C701: library part Capacitor, "CAP, MLCC, X7R, 0.012UF, 16V, 0402; Product Range:C Series; Capacitance:0.012 F; Capacitance Tolerance: 10%; Dielectric Characteristic:X7R; Voltage Rating:16V; Ceramic Capacitor Case:0402 [1005 Metric]; Operating Temperature ;RoHS Compliant: Yes", Case/Package=0402, Case Code (Metric)=1005, Dielectric=X7R, Dielectric Material=Ceramic, Manufacturer=KEMET, Manufacturer Part Number=C0402C123K4RACTU, Max Operating Temperature=125°C, Min Operating Temperature=-55°C, Package Quantity=1, Supplier Part Number 1=399-4875-1-ND, Tolerance=10%, Voltage=16V, Capacitance=12nF, Case Code (Imperial)=0402, Category="Ceramic Capacitors", ComponentLink1Description=https://datasheet.ciiva.com/14599/70095383-14599514.pdf?src-supplier=Allied+Electronics, ComponentLink1URL=https://datasheet.ciiva.com/14599/70095383-14599514.pdf?src-supplier=Allied+Electronics, ComponentLink2Description=https://datasheet.ciiva.com/14606/70095383-14606845.pdf?src-supplier=Allied+Electronics, ComponentLink2URL=https://datasheet.ciiva.com/14606/70095383-14606845.pdf?src-supplier=Allied+Electronics, Depth=0.5mm, Dissipation Factor=3.5%, Height=0.5mm, Lead Pitch=0.3mm, Length=1mm, Mount="Surface Mount,PCB", Packaging="Tape and Reel", Pricing 1="1=0,10000, 10=0,07000, 100=0,03100, 500=0,02214, 1000=0,01739, 2500=0,01581, 5000=0,01455 (USD)", REACH SVHC="No SVHC", RoHS=Yes, Stock 1=50010, Supplier 1=Digi-Key, Termination=SMD/SMT, Thickness=0.022inch, Voltage Rating=16V, Voltage Rating (DC)=16V, Width=0.5mm
C702: library part Capacitor, "Ceramic Capacitor 36PF 50V, C0G, 5%, 0402, Full Reel", Case/Package=0402, Case Code (Metric)=1005, Dielectric=C0G, Manufacturer="Kyocera AVX", Manufacturer Part Number=04025A360JAT2A, Max Operating Temperature=125°C, Min Operating Temperature=-55°C, Package Quantity=10000, Supplier Part Number 1=478-10099-1-ND, Tolerance=5%, Voltage Rating=50V, Capacitance=36pF, Case Code (Imperial)=0402, Category="Ceramic Capacitors", ComponentLink1Description=https://datasheet.ciiva.com/205/ccog-205476.pdf?src-supplier=Digi-Key, ComponentLink1URL=https://datasheet.ciiva.com/205/ccog-205476.pdf?src-supplier=Digi-Key, ComponentLink2Description=https://datasheet.ciiva.com/5423/ccog-5423162.pdf?src-supplier=Mouser, ComponentLink2URL=https://datasheet.ciiva.com/5423/ccog-5423162.pdf?src-supplier=Mouser, Depth=0.5mm, Length=1mm, Mount="Surface Mount", Number of Pins=2, Packaging="Tape and Reel", Pricing 1="1=0,13000, 10=0,09000, 100=0,04240, 500=0,02972, 1000=0,02461, 2500=0,02290, 5000=0,02095 (USD)", Radiation Hardening=No, RoHS=Yes, Stock 1=21315, Supplier 1=Digi-Key, Termination=SMD/SMT, Thickness=0.022inch, Voltage Rating (DC)=50V, Width=0.02inch
C703: library part Capacitor, "Cap Ceramic 0.015uF 25V X7R 10% SMD 0402 125C Paper T/R", Case/Package=0402, Case Code (Metric)=1005, Dielectric=X7R, Manufacturer=Yageo, Manufacturer Part Number=CC0402KRX7R8BB153, Max Operating Temperature=125°C, Min Operating Temperature=-55°C, Supplier Part Number 1=311-1713-1-ND, Tolerance=10%, Voltage Rating=25V, Capacitance=15nF, Case Code (Imperial)=0402, Category="Ceramic Capacitors", ComponentLink1Description=https://datasheet.ciiva.com/13208/upy-gphc-x7r-6-3v-to-50v-8-12304-13208892.pdf?src-supplier=Mouser, ComponentLink1URL=https://datasheet.ciiva.com/13208/upy-gphc-x7r-6-3v-to-50v-8-12304-13208892.pdf?src-supplier=Mouser, ComponentLink2Description=https://datasheet.ciiva.com/17437/upy-gphc-x7r-6-3v-to-50v-8-17437359.pdf?src-supplier=Avnet+Europe, ComponentLink2URL=https://datasheet.ciiva.com/17437/upy-gphc-x7r-6-3v-to-50v-8-17437359.pdf?src-supplier=Avnet+Europe, ComponentLink3Description=https://datasheet.ciiva.com/11464/upy-gphc-x7r-6-3v-to-50v-8-11464890.pdf?src-supplier=Avnet, ComponentLink3URL=https://datasheet.ciiva.com/11464/upy-gphc-x7r-6-3v-to-50v-8-11464890.pdf?src-supplier=Avnet, ComponentLink4Description=https://datasheet.ciiva.com/26829/getdatasheetpartid-748495-26829322.pdf?src-supplier=Verical, ComponentLink4URL=https://datasheet.ciiva.com/26829/getdatasheetpartid-748495-26829322.pdf?src-supplier=Verical, Composition=Ceramic, Depth=0.5mm, Halogen Free="Halogen Free", Height=0.5mm, Lead Free="Lead Free", Length=1mm, Mount="Surface Mount", Packaging="Tape and Reel", Pricing 1="1=0,10000, 10=0,04300, 100=0,01920, 500=0,01374, 1000=0,01080, 2500=0,00982, 5000=0,00903 (USD)", Radiation Hardening=No, RoHS=Yes, Stock 1=34974, Supplier 1=Digi-Key, Termination=SMD/SMT, Thickness=0.022inch, Voltage Rating (DC)=25V, Weight=2.3E-05oz, Width=0.02inch
C704: library part Capacitor, "Cap Ceramic 1uF 10V X5R 10% SMD 0603 85C Paper T/R", Case/Package=0603, Case Code (Metric)=1608, Dielectric=X5R, Manufacturer=Samsung, Manufacturer Part Number=CL10A105KP8NNNC, Max Operating Temperature=85°C, Min Operating Temperature=-55°C, Package Quantity=1, Supplier Part Number 1=1276-1182-1-ND, Tolerance=10%, Voltage=10V, Capacitance=1uF, Case Code (Imperial)=0603, Category="Ceramic Capacitors", ComponentLink1Description=https://datasheet.ciiva.com/15195/getdatasheetpartid-358616-15195708.pdf?src-supplier=Verical, ComponentLink1URL=https://datasheet.ciiva.com/15195/getdatasheetpartid-358616-15195708.pdf?src-supplier=Verical, ComponentLink2Description=https://datasheet.ciiva.com/16358/cl05b104kq5nnnc-16358431.pdf?src-supplier=Future+Electronics, ComponentLink2URL=https://datasheet.ciiva.com/16358/cl05b104kq5nnnc-16358431.pdf?src-supplier=Future+Electronics, Contact Plating=Tin, Depth=0.8mm, Height=0.8mm, Length=1.6mm, Mount="Surface Mount", Packaging="Tape and Reel", Pricing 1="1=0,10000, 10=0,03600, 100=0,01610, 500=0,01152, 1000=0,00905 (USD)", Radiation Hardening=No, RoHS=Yes, Stock 1=3646234, Supplier 1=Digi-Key, Thickness=0.035inch, Voltage Rating=10V, Width=0.031inch
C706 C710: library part Capacitor, "Cap Ceramic 0.01uF 16V X5R 10% SMD 0201 85C Paper T/R", Case/Package=0201, Case Code (Metric)=0603, Dielectric=X5R, Manufacturer=Yageo, Manufacturer Part Number=CC0201KRX5R7BB103, Max Operating Temperature=85°C, Min Operating Temperature=-55°C, Supplier Part Number 1=311-1596-1-ND, Tolerance=10%, Voltage Rating=16V, Capacitance=10nF, Case Code (Imperial)=0201, Category="Ceramic Capacitors", ComponentLink1Description=http://components.arrow.com/part/dataview/0323_04166367?src-supplier=Arrow+Europe, ComponentLink1URL=http://components.arrow.com/part/dataview/0323_04166367?src-supplier=Arrow+Europe, ComponentLink2Description=http://www.mouser.com/ds/2/447/UPY-GPHC_X5R_4V-to-50V_25-1131599.pdf?src-supplier=Mouser, ComponentLink2URL=http://www.mouser.com/ds/2/447/UPY-GPHC_X5R_4V-to-50V_25-1131599.pdf?src-supplier=Mouser, ComponentLink3Description=http://www.yageo.com/documents/recent/UPY-GPHC_X5R_4V-to-50V_25.pdf?src-supplier=Digi-Key, ComponentLink3URL=http://www.yageo.com/documents/recent/UPY-GPHC_X5R_4V-to-50V_25.pdf?src-supplier=Digi-Key, Composition=Ceramic, Depth=0.3mm, Halogen Free="Halogen Free", Lead Free="Lead Free", Length=0.024inch, Mount="Surface Mount", Packaging="Tape and Reel", Pricing 1="1=0,10000, 10=0,01700, 100=0,00740, 500=0,00528, 1000=0,00415, 2500=0,00378, 5000=0,00347 (USD)", RoHS=Yes, Stock 1=528309, Supplier 1=Digi-Key, Termination=SMD/SMT, Thickness=0.013inch, Voltage Rating (DC)=16V, Weight=6E-06oz, Width=0.012inch